# Altium PCB Bracelet_Aux_v2.0.PcbDoc
Units mil, origin at the board's own origin, x right, y up, seen from the top; angles counter-clockwise.
Board outline 590.55 x 236.42 mil, 2 copper layers (Top Layer, Bottom Layer), stack 57 mil thick; 4 components, 2 nets, 13 pads, 4 vias.
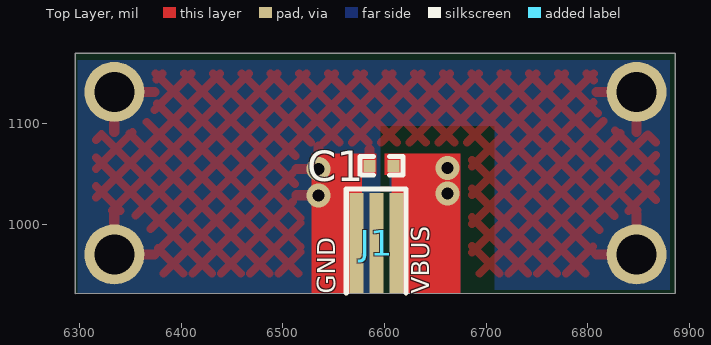
[diagram p0: Top Layer view]
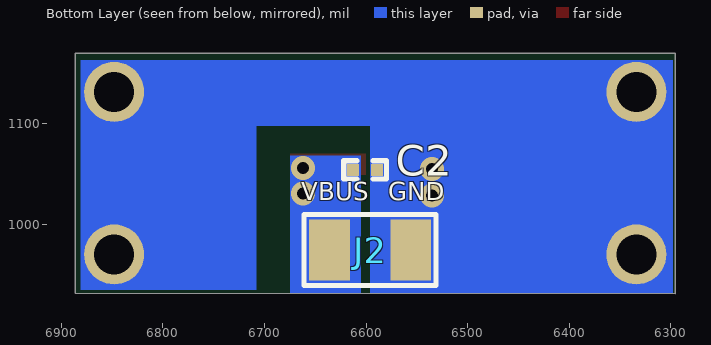
[diagram p1: Bottom Layer view, seen from below]

## Layer stack, top to bottom
Top Solder: solder mask 3, Solder Resist, Dk 3.5
Top Layer: signal copper 10
Dielectric 1: dielectric 37, FR-4, Dk 4.8
Bottom Layer: signal copper 10
Bottom Solder: solder mask 3, Solder Resist, Dk 3.5

## Board outline
6295.65,932.31 6295.65,1168.73 6886.2,1168.73 6886.2,932.34

## Design rules (kind name [scope] priority, off if disabled: settings)
Clearance [All] p1: gap=7 ignorepadtopadclearanceinfootprint=FALSE except(0: Arc-Hole Track-Hole SMDPad-Hole THPad-Hole Via-Hole Fill-Hole Poly-Hole Region-Hole Text-Hole; 3: Arc-SMDPad Track-SMDPad SMDPad-SMDPad)
MinimumSolderMaskSliver [All] p1: minsoldermaskwidth=0
PolygonConnect [All] p1: thpad.connectstyle=Relief thpad.reliefconductorwidth=10 thpad.reliefentries=4 thpad.polygonreliefangle="90 Angle" thpad.airgapwidth=10 smdpad.connectstyle=Direct smdpad.reliefconductorwidth=10 smdpad.reliefentries=4 smdpad.polygonreliefangle="90 Angle" smdpad.airgapwidth=10 via.connectstyle=Relief via.reliefconductorwidth=10 via.reliefentries=4 via.polygonreliefangle="90 Angle" via.airgapwidth=10
RoutingVias [All] p1: holewidth=11.81 width=23.62 viastyle="Through Hole" minholewidth=11.81 minwidth=23.62 maxholewidth=11.81 maxwidth=23.62
SilkToSilkClearance [All] p1: silktosilkclearance=0
SilkToSolderMaskClearance [IsPad] p1: minsilkscreentomaskgap=0 clearancetoexposedcopper=TRUE
SolderMaskExpansion [All] p1: expansion=4
Width [All] p1: maxlimit=10 minlimit=10 preferedwidth=10
27 further rules are at their usual default settings.

## Classes and differential pairs
component class U_Connector_Section: C1 C2 J1

## Components (designator, comment, footprint, x,y, rotation, side; value= is the part's Value field where it differs from the comment)
C1 "0.1uF" "CAP 0201" 6597,1058 r180 top
C2 "0.1uF" "CAP 0201" 6601,1054 r180 bottom
J1 "3 Pin FPC" "3 Pin FPC" 6592.31,982 r180 top
J2 "SMD PADS" "SMD PAD" 6596,975 r180 bottom

## Footprints (in the part's own frame and the unit in brackets; to place one, negate y for a bottom-side part, rotate by r counter-clockwise, add the part's x,y. Pads: shape width x height; smd on the part's side, far side on the other; paste and mask are expansions set on the pad)
"3 Pin FPC" [mm]
  rect 0.35x2.5 smd: 1(-0.5,0) 2(0,0) 3(0.5,0)
  silkscreen extent -0.73,-1.35 0.76,1.24
"CAP 0201" [mm]
  rect 0.3x0.3 smd mask+0.055: 1(-0.3,0) 2(0.3,0)
  silkscreen extent -0.53,-0.23 0.53,0.23, body extent -0.3,-0.15 0.3,0.15, height 0.28
"SMD PAD" [mil] "SMD 0805"
  rect 40x60 smd: 1(-40,0) 2(40,0)
  silkscreen extent -65,-35 65,35

## Part data
C1 C2: library part GRM033R61E104KE14D, "Multilayer Ceramic Capacitors MLCC - SMD/SMT 0201 0.1uF 25volts X5R 10%", Capacitance=100nF, Case/Package=0201, Case Code (Metric)=0603, Dielectric=X5R, Manufacturer=Murata, Max Operating Temperature=85°C, Min Operating Temperature=-55°C, Package Quantity=15000, Resistor Type=Ceramic, Supplier Part Number 1=81-GRM033R61E104KE4D, Tolerance=10%, Voltage Rating=25V, Case Code (Imperial)=0201, Category="Ceramic Capacitors", ComponentLink1Description=http://www.farnell.com/datasheets/2867843.pdf?src-supplier=Farnell, ComponentLink1URL=http://www.farnell.com/datasheets/2867843.pdf?src-supplier=Farnell, ComponentLink2Description=http://www.mouser.com/ds/2/281/c02e-2905.pdf?src-supplier=Mouser, ComponentLink2URL=http://www.mouser.com/ds/2/281/c02e-2905.pdf?src-supplier=Mouser, ComponentLink3Description=http://search.murata.co.jp/Ceramy/image/img/A01X/G101/ENG/GRM033R61E104KE14-01.pdf?src-supplier=Digi-Key, ComponentLink3URL=http://search.murata.co.jp/Ceramy/image/img/A01X/G101/ENG/GRM033R61E104KE14-01.pdf?src-supplier=Digi-Key, ComponentLink4Description=http://www.farnell.com/datasheets/2867843.pdf?src-supplier=Newark, ComponentLink4URL=http://www.farnell.com/datasheets/2867843.pdf?src-supplier=Newark, Height=0.3mm, Lead Free="Lead Free", Length=0.024inch, Manufacturer Part Number=GRM033R61E104KE14D, Mount="Surface Mount", Packaging="Tape and Reel", Pricing 1="1=0.10000, 10=0.03100, 50=0.03100, 100=0.02500, 1000=0.01700, 10000=0.01400 (USD)", RoHS=Yes, RoHS Compliant=Yes, Stock 1=22478, Supplier 1=Mouser, Termination=SMD/SMT, Thickness=0.013inch, Voltage Rating (DC)=25V, Weight=1.2E-05oz, Width=0.012inch
J1: "CONN FPC 3POS 0.5MM SMD R/A", ComponentLink1Description=https://www.molex.com/pdm_docs/pk/5051479200-200.pdf?src-supplier=Digi-Key, ComponentLink1URL=https://www.molex.com/pdm_docs/pk/5051479200-200.pdf?src-supplier=Digi-Key, ComponentLink2Description=http://www.molex.com/pdm_docs/sd/5051470390_sd.pdf?src-supplier=Digi-Key, ComponentLink2URL=http://www.molex.com/pdm_docs/sd/5051470390_sd.pdf?src-supplier=Digi-Key, ComponentLink3Description=https://www.molex.com/pdm_docs/sd/5051470390_sd.pdf?src-supplier=Digi-Key, ComponentLink3URL=https://www.molex.com/pdm_docs/sd/5051470390_sd.pdf?src-supplier=Digi-Key
J2: library part "SMD PAD"

## Free pads (board coordinates)
  round 59.06 hole 39.37: MH1(6848,1130.73) MH2(6848,970.73) MH3(6334,970.73) MH4(6334,1130.73)

## Via types
v1: diameter 23.62, hole 11.81, Top Layer to Bottom Layer, tented both sides, 4 vias

## Nets (pads, with @x,y where several pads share a name; then routed paths per layer and width w, separated by ;. In a path a pad name is that pad's centre, name@x,y a point inside that pad or via, vN(x,y) a via of type N, cw(c..) or ccw(c..) an arc to the next point about the centre after c; other vN are vias at no path point)
GND: C1.2 C2.2 J1.3 J2.2 pad.MH1 pad.MH2 pad.MH3 pad.MH4 | length 5.7
  Bottom Layer w10: v1@6531,1059 v1(6535,1055)
  other v1: 6535,1029
VBUS: C1.1 C2.1 J1.1 J2.1 | length 25
  Bottom Layer w10: v1(6662,1031) v1(6662,1056)
pads on no net: J1.2

## Polygon pours and split planes (outlines as drawn)
GND on Top Layer "Polygon_1" (hatched 45Degree grid 20 track 8, remove dead copper, pour order 4): 6316,1149 6316,952 6867,952 6867,1149

## Other copper
Top Layer:
  rectangle net VBUS: 6600,1049 6625,1070
  rectangle net GND: 6562,1049 6592.31,1070
  rectangle net GND: 6528,932 6578,1070
  rectangle net VBUS: 6607,932 6675,1070
Bottom Layer:
  rectangle net GND: 6560,1097 6878,1162
  rectangle net GND: 6708,936 6881,1162
  rectangle net GND: 6298,932 6596,1162
  rectangle net GND: 6527,932 6596,1067
  rectangle net VBUS: 6605,933 6675,1068

## Silkscreen, mask and mechanical layers (free items; w line width, h text height)
Top Overlay:
  text "GND" at 6557.31,932 h30 r90
  text "VBUS" at 6650,932 h30 r90
Bottom Overlay:
  text "GND" at 6578,1018 h30
  text "VBUS" at 6664,1018 h30
Mechanical 2:
  the board outline again, w10